# Altium PCB Kasli-DIOT.PCBDOC (part 18 of 23)
Units mm, origin at the board's own origin, x right, y up, seen from the top; angles counter-clockwise.
Board outline 222.9 x 100 mm, 10 copper layers (TopLayer, Layer 2, Layer 3, Layer 4, Layer 5, Layer 6, Layer 7, layer 8, Layer 9, BottomLayer), stack 1.564 mm thick; 977 components, 900 nets, 4676 pads, 2725 vias.
Unrouted connection lines stored in the file: 17.
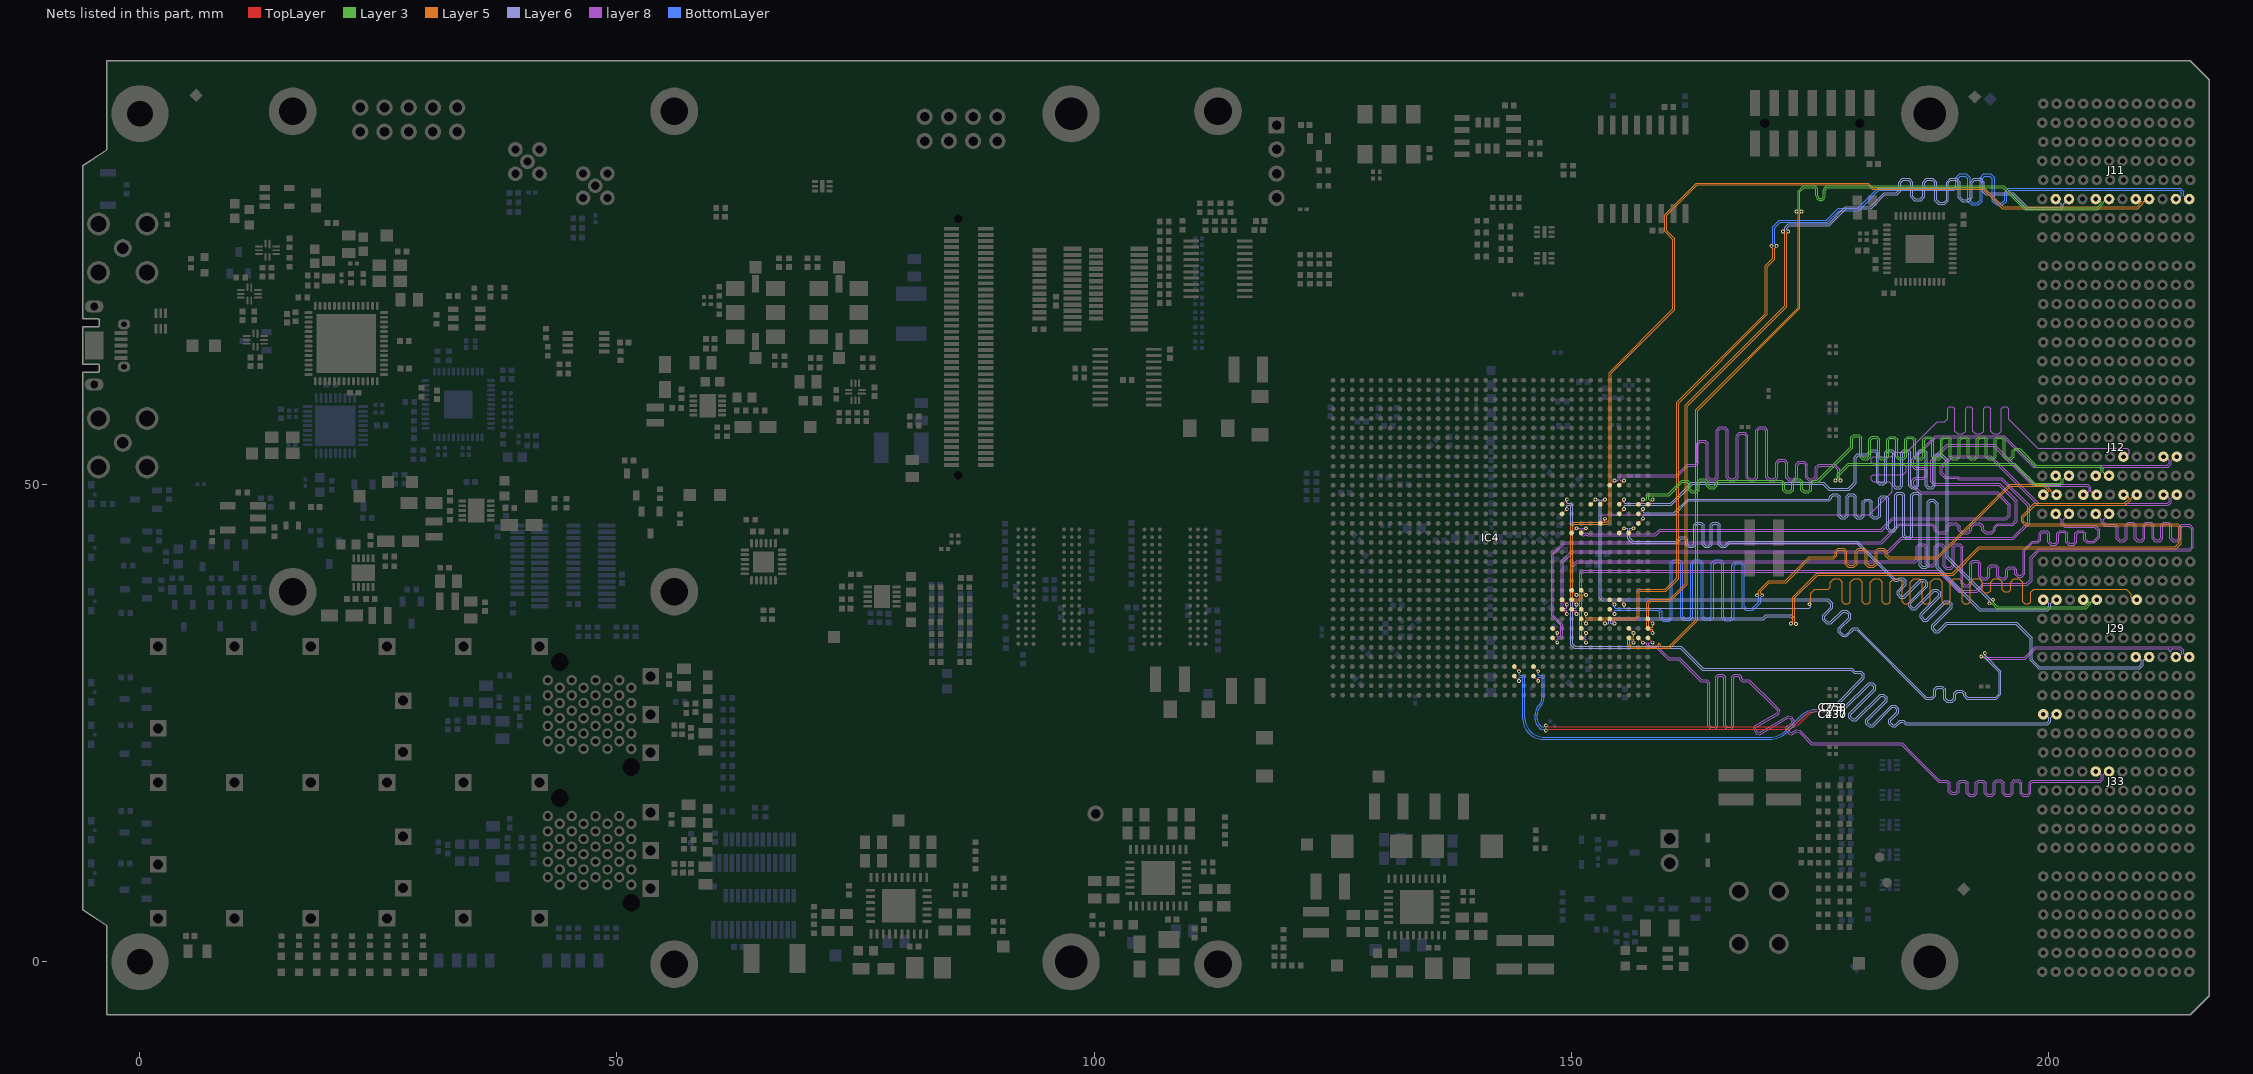
[diagram p24: the nets of this part, all layers, seen from the top]

## Via types
v1: diameter 0.4, hole 0.2, TopLayer to BottomLayer, tented both sides, 1723 vias
v2: diameter 0.5, hole 0.2, TopLayer to BottomLayer, tented both sides, 524 vias
v3: diameter 0.6, hole 0.3, TopLayer to BottomLayer, tented both sides, 172 vias
v4: diameter 0.6, hole 0.3, TopLayer to BottomLayer, 113 vias
v5: diameter 0.5, hole 0.2, TopLayer to BottomLayer, 107 vias
v6: diameter 0.4, hole 0.2, TopLayer to BottomLayer, 67 vias
v7: diameter 0.5, hole 0.25, TopLayer to BottomLayer, tented both sides, 12 vias
v8: diameter 0.8, hole 0.5, TopLayer to BottomLayer, tented both sides, 7 vias

## Nets (pads, with @x,y where several pads share a name; then routed paths per layer and width w, separated by ;. In a path a pad name is that pad's centre, name@x,y a point inside that pad or via, vN(x,y) a via of type N, cw(c..) or ccw(c..) an arc to the next point about the centre after c; other vN are vias at no path point) (continued)
SLOT3.LVDS_4_P: IC4.AD31 J29.E6 | length 97.4
  TopLayer w0.095: IC4.AD31@155.061,37.95 v1(155.561,37.45)
  Layer 5 w0.08: v1(174.994,37.476) 174.994,37.563 175.154,37.723 175.154,38.636 175.573,39.054 176.875,39.054 176.976,39.054 177.186,39.265 177.186,39.796 177.518,40.128 178.111,40.128 178.442,39.796 178.442,37.757 178.653,37.546 179.074,37.546 179.284,37.757 179.284,39.796 179.616,40.128 180.209,40.128 180.54,39.796 180.54,37.757 180.751,37.546 181.172,37.546 181.382,37.757 181.382,39.796 181.714,40.128 182.307,40.128 182.638,39.796 182.638,37.757 182.849,37.546 183.27,37.546 183.48,37.757 183.48,39.796 183.812,40.128 184.405,40.128 184.736,39.796 184.736,37.757 184.947,37.546 185.368,37.546 185.578,37.757 185.578,39.796 185.91,40.128 186.503,40.128 186.834,39.796 186.834,37.757 187.045,37.546 187.466,37.546 187.676,37.757 187.676,39.796 188.008,40.128 188.601,40.128 188.932,39.796 188.932,37.757 189.143,37.546 189.564,37.546 189.774,37.757 189.774,39.796 190.106,40.128 190.699,40.128 191.03,39.796 191.03,37.757 191.241,37.546 191.662,37.546 191.872,37.757 191.872,39.796 192.204,40.128 192.797,40.128 193.128,39.796 193.128,38.91 193.339,38.699 193.76,38.699 193.97,38.91 193.97,39.796 194.302,40.128 194.895,40.128 195.226,39.796 195.226,39.006 195.437,38.796 195.858,38.796 196.068,39.006 196.068,39.796 196.4,40.128 196.993,40.128 197.324,39.796 197.324,37.757 197.535,37.546 197.956,37.546 198.166,37.757 198.166,38.723 198.498,39.054 199.4,39.054 208.175,39.054 208.703,38.527 208.703,38.235 208.75,38.188 208.786,38.188 209.024,37.95 J29.E6@209.3,37.95
  Layer 6 w0.08: v1(155.561,37.45) 155.561,37.1 155.608,37.053 174.957,37.053 175.13,37.226 175.13,37.293 174.994,37.429 v1(174.994,37.476)
SLOT3.LVDS_5_N: IC4.AH27 J12.H1 | length 101.4
  TopLayer w0.095: IC4.AH27@151.061,33.95 v1(151.561,33.45)
  layer 8 w0.075: v1(151.561,33.45) 151.561,33.805 151.517,33.849 151.151,33.849 150.926,34.074 150.926,40.75 151.225,41.05 152.275,41.05 188.628,41.05 189.492,40.185 190.214,39.464 190.723,38.955 192.474,38.955 193.185,39.666 197.738,39.666 198.118,40.045 198.118,42.392 199.009,43.283 214.8,43.283 215.043,43.526 215.043,45.361 214.9,45.504 214.757,45.647 214.201,45.647 214.104,45.647 213.92,45.463 213.92,44.342 213.617,44.039 213.081,44.039 212.779,44.342 212.779,45.676 212.595,45.861 212.226,45.861 212.042,45.676 212.042,44.342 211.739,44.039 211.203,44.039 210.901,44.342 210.901,45.676 210.717,45.861 210.348,45.861 210.164,45.676 210.164,44.342 209.861,44.039 209.325,44.039 209.023,44.342 209.023,45.676 208.839,45.861 208.47,45.861 208.286,45.676 208.286,44.342 207.983,44.039 207.447,44.039 207.145,44.342 207.145,45.463 206.961,45.647 206.761,45.647 206.018,45.647 205.599,46.066 205.599,46.351 J12.H1@205,46.95
SLOT3.LVDS_5_P: IC4.AG27 J12.G1 | length 101.1
  TopLayer w0.095: IC4.AG27@151.061,34.95 v1(151.561,34.45)
  layer 8 w0.075: v1(151.561,34.45) 151.561,34.095 151.517,34.051 151.234,34.051 151.128,34.158 151.128,40.667 151.309,40.848 152.359,40.848 188.544,40.848 189.29,40.102 190,39.392 190.639,38.753 192.558,38.753 193.269,39.464 197.822,39.464 198.32,39.962 198.32,42.309 199.092,43.081 214.883,43.081 215.245,43.442 215.245,45.445 214.841,45.849 214.201,45.849 214.02,45.849 213.718,45.546 213.718,44.425 213.534,44.241 213.165,44.241 212.981,44.425 212.981,45.76 212.678,46.063 212.142,46.063 211.84,45.76 211.84,44.425 211.656,44.241 211.287,44.241 211.103,44.425 211.103,45.76 210.8,46.063 210.264,46.063 209.962,45.76 209.962,44.425 209.778,44.241 209.409,44.241 209.225,44.425 209.225,45.76 208.922,46.063 208.386,46.063 208.084,45.76 208.084,44.425 207.9,44.241 207.531,44.241 207.347,44.425 207.347,45.546 207.044,45.849 206.761,45.849 206.102,45.849 205.801,46.15 205.801,46.351 J12.G1@206.4,46.95
SLOT3.LVDS_6_N: IC4.AE26 J12.K1 | length 97.7
  TopLayer w0.095: IC4.AE26@150.061,36.95 v1(150.561,36.45)
  layer 8 w0.075: v1(150.561,36.45) 150.561,36.805 150.517,36.849 150.157,36.849 149.995,37.011 149.995,41.469 150.575,42.05 185.905,42.05 186.002,42.05 186.186,42.234 186.186,43.495 186.489,43.798 187.024,43.798 187.327,43.495 187.327,41.811 187.511,41.627 187.88,41.627 188.064,41.811 188.064,43.495 188.367,43.798 188.902,43.798 189.205,43.495 189.205,41.532 189.389,41.348 189.758,41.348 189.942,41.532 189.942,43.495 190.245,43.798 190.78,43.798 191.083,43.495 191.083,39.716 191.267,39.532 191.636,39.532 191.82,39.716 191.82,41.796 192.123,42.099 192.659,42.099 192.961,41.796 192.961,40.427 193.145,40.243 193.514,40.243 193.698,40.427 193.698,41.31 194.001,41.612 194.537,41.612 194.839,41.31 194.839,40.427 195.023,40.243 195.392,40.243 195.576,40.427 195.576,41.118 195.879,41.42 196.415,41.42 196.717,41.118 196.717,40.697 196.901,40.513 197.107,40.513 197.143,40.513 197.379,40.748 197.379,43.157 198.331,44.109 198.775,44.109 198.872,44.109 199.056,44.293 199.056,44.9 199.359,45.202 199.895,45.202 200.197,44.9 200.197,44.044 200.381,43.86 200.75,43.86 200.934,44.044 200.934,44.903 201.237,45.205 201.773,45.205 202.075,44.903 202.075,44.044 202.26,43.86 202.628,43.86 202.812,44.044 202.812,44.905 203.115,45.208 203.651,45.208 203.953,44.905 203.953,44.293 204.138,44.109 204.42,44.109 204.759,44.109 205.238,44.588 205.238,45.181 204.862,45.558 201.727,45.558 201.399,45.886 201.399,46.351 J12.K1@200.8,46.95
SLOT3.LVDS_6_P: IC4.AD26 J12.J1 | length 97.4
  TopLayer w0.095: IC4.AD26@150.061,37.95 v1(150.561,37.45)
  layer 8 w0.075: v1(150.561,37.45) 150.561,37.095 150.517,37.051 150.24,37.051 150.197,37.095 150.197,41.386 150.659,41.848 185.905,41.848 186.085,41.848 186.388,42.151 186.388,43.411 186.572,43.596 186.941,43.596 187.125,43.411 187.125,41.728 187.428,41.425 187.963,41.425 188.266,41.728 188.266,43.411 188.45,43.596 188.819,43.596 189.003,43.411 189.003,41.448 189.306,41.146 189.841,41.146 190.144,41.448 190.144,43.411 190.328,43.596 190.697,43.596 190.881,43.411 190.881,39.632 191.184,39.33 191.72,39.33 192.022,39.632 192.022,41.712 192.206,41.897 192.575,41.897 192.759,41.712 192.759,40.343 193.062,40.041 193.598,40.041 193.9,40.343 193.9,41.226 194.084,41.41 194.453,41.41 194.637,41.226 194.637,40.343 194.94,40.041 195.476,40.041 195.778,40.343 195.778,41.034 195.962,41.218 196.331,41.218 196.515,41.034 196.515,40.613 196.818,40.311 197.107,40.311 197.227,40.311 197.581,40.665 197.581,43.073 198.415,43.907 198.775,43.907 198.956,43.907 199.258,44.21 199.258,44.816 199.442,45 199.811,45 199.995,44.816 199.995,43.961 200.298,43.658 200.834,43.658 201.136,43.961 201.136,44.819 201.321,45.003 201.689,45.003 201.873,44.819 201.873,43.961 202.176,43.658 202.712,43.658 203.014,43.961 203.014,44.822 203.199,45.006 203.567,45.006 203.751,44.822 203.751,44.21 204.054,43.907 204.42,43.907 204.843,43.907 205.44,44.505 205.44,45.265 204.945,45.76 201.81,45.76 201.601,45.969 201.601,46.351 J12.J1@202.2,46.95
SLOT3.LVDS_7_N: IC4.AE25 J12.C2 | length 98
  TopLayer w0.095: IC4.AE25@149.061,36.95 v1(149.561,36.45)
  layer 8 w0.075: v1(149.561,36.45) 149.561,36.805 149.517,36.849 149.22,36.849 148.995,37.075 148.995,41.984 150.096,43.085 183.211,43.085 184.603,44.478 196.278,44.478 197.861,46.061 197.861,47.773 195.078,50.556 190.627,50.556 190.516,50.666 189.191,50.666 189.132,50.725 188.686,51.172 188.686,51.871 189.865,53.05 194.018,53.05 196.139,50.929 198.118,48.95 199.018,48.05 212.522,48.05 212.699,48.226 212.699,48.589 212.338,48.95 J12.C2@212.1,48.95
SLOT3.LVDS_7_P: IC4.AD25 J12.B2 | length 97.6
  TopLayer w0.095: IC4.AD25@149.061,37.95 v1(149.561,37.45)
  layer 8 w0.075: v1(149.561,37.45) 149.561,37.095 149.517,37.051 149.304,37.051 149.197,37.158 149.197,41.9 150.18,42.883 183.294,42.883 184.687,44.276 196.362,44.276 198.063,45.977 198.063,47.857 195.162,50.758 190.71,50.758 190.6,50.868 189.275,50.868 188.888,51.255 188.888,51.787 189.948,52.848 193.934,52.848 195.937,50.845 197.904,48.879 198.934,47.848 212.606,47.848 212.901,48.143 212.901,48.589 213.262,48.95 J12.B2@213.5,48.95
SLOT3.LVDS_8_N: IC4.AF30 J12.F2 | length 98.8
  TopLayer w0.095: IC4.AF30@154.061,35.95 v1(154.561,35.45)
  Layer 5 w0.08: v1(173.061,35.45) 173.061,35.479 173.239,35.657 173.239,38.221 175.768,40.75 189.968,40.75 192.722,43.504 213.353,43.504 213.761,43.911 213.761,45.474 213.531,45.704 197.629,45.704 197.221,46.111 197.221,46.711 198.56,48.05 208.014,48.05 208.496,48.533 208.496,48.599 208.145,48.95 J12.F2@207.9,48.95
  Layer 6 w0.08: v1(154.561,35.45) 154.211,35.45 154.165,35.497 154.165,35.688 154.327,35.85 167.622,35.85 167.624,35.851 170.205,35.851 170.517,36.163 173.005,36.163 173.264,35.905 173.264,35.653 v1(173.061,35.45)
SLOT3.LVDS_8_P: IC4.AF29 J12.E2 | length 99.5
  TopLayer w0.095: IC4.AF29@153.061,35.95 v1(153.561,35.45)
  Layer 5 w0.08: v1@173.628,35.438 173.446,35.621 173.446,38.135 175.854,40.543 190.054,40.543 192.808,43.297 213.439,43.297 213.968,43.825 213.968,45.56 213.617,45.911 197.714,45.911 197.428,46.197 197.428,46.625 198.646,47.843 208.099,47.843 208.703,48.447 208.703,48.599 209.054,48.95 J12.E2@209.3,48.95
  Layer 6 w0.08: v1(153.561,35.45) 153.911,35.45 153.958,35.497 153.958,35.774 154.241,36.057 167.536,36.057 167.538,36.058 170.119,36.058 170.431,36.37 173.091,36.37 173.471,35.99 173.471,35.596 173.585,35.482 v1(173.585,35.395)
SLOT3.LVDS_9_N: IC4.AH24 J12.I2 | length 98.2
  TopLayer w0.095: IC4.AH24@148.061,33.95 v1(148.561,33.45)
  layer 8 w0.075: v1(148.561,33.45) 148.561,33.805 148.605,33.849 148.914,33.849 149.147,34.082 149.147,35.348 148.161,36.335 148.161,42.65 149.351,43.84 182.551,43.84 184.451,45.74 186.498,45.74 187.834,45.74 188.093,45.481 188.093,45.23 188.471,44.853 189.157,44.853 189.534,45.23 189.534,45.564 189.793,45.823 190.312,45.823 190.571,45.564 190.571,45.23 190.949,44.853 191.635,44.853 192.012,45.23 192.012,45.564 192.271,45.823 192.79,45.823 193.049,45.564 193.049,45.23 193.427,44.853 194.113,44.853 194.49,45.23 194.49,45.481 194.749,45.74 194.962,45.74 196.337,45.74 196.774,46.177 196.774,48.33 194.923,50.181 188.098,50.181 187.894,50.385 187.894,52.473 189.479,54.057 194.254,54.057 197.504,50.807 198.461,49.85 204.081,49.85 204.299,49.632 204.299,49.311 203.938,48.95 J12.I2@203.7,48.95
SLOT3.LVDS_9_P: IC4.AG24 J12.H2 | length 98.5
  TopLayer w0.095: IC4.AG24@148.061,34.95 v1(148.561,34.45)
  layer 8 w0.075: v1(148.561,34.45) 148.561,34.095 148.605,34.051 148.83,34.051 148.945,34.166 148.945,35.265 147.959,36.251 147.959,42.734 149.267,44.042 182.467,44.042 184.367,45.942 186.498,45.942 187.918,45.942 188.295,45.565 188.295,45.314 188.554,45.055 189.073,45.055 189.332,45.314 189.332,45.648 189.71,46.025 190.396,46.025 190.773,45.648 190.773,45.314 191.032,45.055 191.551,45.055 191.81,45.314 191.81,45.648 192.188,46.025 192.874,46.025 193.251,45.648 193.251,45.314 193.51,45.055 194.029,45.055 194.288,45.314 194.288,45.565 194.666,45.942 194.962,45.942 196.253,45.942 196.572,46.261 196.572,48.246 194.839,49.979 188.014,49.979 187.692,50.301 187.692,52.557 189.395,54.259 194.337,54.259 197.504,51.093 198.545,50.052 204.164,50.052 204.501,49.716 204.501,49.311 204.862,48.95 J12.H2@205.1,48.95
SLOT3.LVDS_10_N: IC4.AE30 J12.L2 | length 106.8
  TopLayer w0.095: IC4.AE30@154.061,36.95 v1(154.561,36.45)
  Layer 5 w0.08: v1(170.035,38.417) 170.035,38.464 169.875,38.624 169.875,38.834 170.792,39.75 172.554,39.75 175.047,42.243 177.361,42.243 177.547,42.243 177.879,42.575 177.879,42.941 178.09,43.151 178.511,43.151 178.721,42.941 178.721,41.667 179.053,41.335 179.645,41.335 179.977,41.667 179.977,42.941 180.188,43.151 180.609,43.151 180.819,42.941 180.819,41.667 181.151,41.335 181.743,41.335 182.075,41.667 182.075,42.941 182.286,43.151 182.707,43.151 182.917,42.941 182.917,42.575 183.249,42.243 183.662,42.243 188.454,42.243 196.061,49.85 199.614,49.85 200.096,49.368 200.096,49.301 199.745,48.95 J12.L2@199.5,48.95
  BottomLayer w0.095: v1(154.561,36.45) 154.561,36.783 154.617,36.839 157.914,36.839 159.105,36.839 159.32,36.625 159.32,36.04 159.664,35.696 160.276,35.696 160.621,36.04 160.621,41.687 160.835,41.901 161.263,41.901 161.478,41.687 161.478,36.13 161.822,35.786 162.434,35.786 162.779,36.13 162.779,41.687 162.993,41.901 163.421,41.901 163.636,41.687 163.636,36.13 163.98,35.786 164.592,35.786 164.937,36.13 164.937,41.687 165.151,41.901 165.579,41.901 165.794,41.687 165.794,36.089 166.138,35.745 166.75,35.745 167.095,36.089 167.095,41.491 167.309,41.706 167.737,41.706 167.952,41.491 167.952,37.183 168.296,36.839 169.064,36.839 169.286,37.061 169.883,37.658 169.883,38.209 170.035,38.361 v1(170.035,38.417)
SLOT3.LVDS_10_P: IC4.AD30 J12.K2 | length 107.2
  TopLayer w0.095: IC4.AD30@154.061,37.95 v1(154.561,37.45)
  Layer 5 w0.08: v1(169.509,38.417) 169.509,38.464 169.668,38.624 169.668,38.92 170.706,39.957 172.468,39.957 174.961,42.45 177.361,42.45 177.462,42.45 177.672,42.66 177.672,43.026 178.004,43.358 178.596,43.358 178.928,43.026 178.928,41.752 179.139,41.542 179.56,41.542 179.77,41.752 179.77,43.026 180.102,43.358 180.694,43.358 181.026,43.026 181.026,41.752 181.237,41.542 181.658,41.542 181.868,41.752 181.868,43.026 182.2,43.358 182.792,43.358 183.124,43.026 183.124,42.66 183.335,42.45 183.662,42.45 188.368,42.45 195.975,50.057 199.7,50.057 200.303,49.453 200.303,49.301 200.654,48.95 J12.K2@200.9,48.95
  BottomLayer w0.095: v1(154.561,37.45) 154.561,37.117 154.617,37.061 157.914,37.061 159.197,37.061 159.542,36.717 159.542,36.132 159.756,35.918 160.184,35.918 160.399,36.132 160.399,41.779 160.743,42.123 161.355,42.123 161.7,41.779 161.7,36.222 161.914,36.008 162.342,36.008 162.557,36.222 162.557,41.779 162.901,42.123 163.513,42.123 163.858,41.779 163.858,36.222 164.072,36.008 164.5,36.008 164.715,36.222 164.715,41.779 165.059,42.123 165.671,42.123 166.016,41.779 166.016,36.181 166.23,35.967 166.658,35.967 166.873,36.181 166.873,41.583 167.217,41.928 167.829,41.928 168.174,41.583 168.174,37.275 168.388,37.061 168.972,37.061 169.286,37.375 169.661,37.75 169.661,38.209 169.509,38.361 v1(169.509,38.417)
SLOT3.LVDS_11_N: IC4.AF27 J11.B3 | length 110.7
  TopLayer w0.095: IC4.AF27@151.061,35.95 v1(151.561,35.45)
  Layer 5 w0.08: v1(151.561,35.45) 151.561,35.8 151.608,35.846 156.769,35.846 157.135,36.212 157.135,38.724 157.261,38.85 159.954,38.85 161.268,40.164 161.268,58.557 170.568,67.857 170.568,72.857 171.368,73.657 171.368,74.803 171.528,74.963 v1(171.528,75.05)
  BottomLayer w0.095: v1(171.528,75.05) 171.528,75.106 171.376,75.258 171.376,76.965 171.911,77.5 176.85,77.5 178.094,78.745 180.144,78.745 182.25,80.85 189.954,80.85 190.159,80.85 190.553,81.244 190.553,82.094 190.817,82.358 191.346,82.358 191.61,82.094 191.61,79.736 192.004,79.342 192.717,79.342 193.111,79.736 193.111,82.094 193.375,82.358 193.904,82.358 194.168,82.094 194.168,79.736 194.562,79.342 195.275,79.342 195.669,79.736 195.669,80.586 195.933,80.85 196.548,80.85 213.789,80.85 213.989,80.65 213.989,80.478 213.989,80.307 213.632,79.95 J11.B3@213.4,79.95
SLOT3.LVDS_11_P: IC4.AE27 J11.A3 | length 111.1
  TopLayer w0.095: IC4.AE27@151.061,36.95 v1(151.561,36.45)
  Layer 5 w0.08: v1(151.561,36.45) 151.561,36.1 151.608,36.053 156.684,36.053 156.928,36.298 156.928,38.81 157.175,39.057 159.868,39.057 161.061,40.25 161.061,58.643 170.361,67.943 170.361,72.943 171.161,73.743 171.161,74.803 171.001,74.963 v1(171.001,75.05)
  BottomLayer w0.095: v1(171.001,75.05) 171.001,75.106 171.154,75.258 171.154,77.056 171.819,77.722 176.758,77.722 178.003,78.967 180.053,78.967 182.158,81.072 189.954,81.072 190.067,81.072 190.331,81.336 190.331,82.186 190.725,82.58 191.438,82.58 191.832,82.186 191.832,79.828 192.096,79.564 192.625,79.564 192.889,79.828 192.889,82.186 193.283,82.58 193.996,82.58 194.39,82.186 194.39,79.828 194.654,79.564 195.183,79.564 195.447,79.828 195.447,80.678 195.841,81.072 196.548,81.072 213.881,81.072 214.211,80.742 214.211,80.386 214.211,80.307 214.568,79.95 J11.A3@214.8,79.95
SLOT3.LVDS_12_N: IC4.AC27 J11.E3 | length 103.2
  TopLayer w0.095: IC4.AC27@151.061,38.95 v1(151.561,38.45)
  Layer 5 w0.08: v1(151.561,38.45) 151.211,38.45 151.165,38.403 151.165,38.124 150.883,37.843 150.174,37.843 149.954,38.063 149.954,45.736 150.275,46.057 153.694,46.057 153.987,46.35 153.987,61.769 160.661,68.443 160.661,75.709 159.814,76.556 159.814,78.322 163.126,81.634 181.182,81.634 181.644,81.171 193.271,81.171 195.295,79.148 209.345,79.148 209.796,79.599 209.796,79.665 209.749,79.712 209.714,79.712 209.476,79.95 J11.E3@209.2,79.95
SLOT3.LVDS_12_P: IC4.AC26 J11.D3 | length 102.5
  TopLayer w0.095: IC4.AC26@150.061,38.95 v1(150.561,38.45)
  Layer 5 w0.08: v1(150.561,38.45) 150.911,38.45 150.958,38.403 150.958,38.21 150.798,38.05 150.26,38.05 150.161,38.149 150.161,45.65 150.361,45.85 153.78,45.85 154.194,46.264 154.194,61.683 160.868,68.357 160.868,75.795 160.021,76.642 160.021,78.236 163.212,81.427 181.096,81.427 181.558,80.964 193.186,80.964 195.209,78.941 209.431,78.941 210.003,79.513 210.003,79.665 210.05,79.712 210.086,79.712 210.324,79.95 J11.D3@210.6,79.95
SLOT3.LVDS_13_N: IC4.AH32 J11.H3 | length 96.1
  TopLayer w0.095: IC4.AH32@156.061,33.95 v1(156.561,33.45)
  Layer 3 w0.075: v1(173.634,78.65) 173.634,78.694 173.797,78.856 173.797,80.796 174.355,81.355 174.626,81.355 175.383,81.355 cw(c175.383,80.862) 175.876,80.862 175.876,80.291 ccw(c176.168,80.291) 176.459,80.291 176.459,80.862 cw(c176.953,80.862) 176.953,81.355 177.091,81.355 195.358,81.355 197.663,79.05 205.11,79.05 205.599,79.539 205.599,79.601 205.249,79.95 J11.H3@205,79.95
  Layer 5 w0.08: v1(156.561,33.45) 156.561,33.8 156.514,33.846 156.256,33.846 156.135,33.725 156.135,33.298 156.383,33.05 158.835,33.05 159.007,33.05 ccw(c159.007,33.165) 159.122,33.165 159.122,33.243 cw(c159.237,33.243) 159.237,33.358 cw(c159.237,33.243) 159.352,33.243 159.352,33.165 ccw(c159.467,33.165) 159.467,33.05 159.737,33.05 160.239,33.05 163.054,35.865 163.054,57.843 173.794,68.583 173.794,78.443 173.634,78.603 v1(173.634,78.65)
SLOT3.LVDS_13_P: IC4.AG32 J11.G3 | length 96.7
  TopLayer w0.095: IC4.AG32@156.061,34.95 v1(156.561,34.45)
  Layer 3 w0.075: v1(174.161,78.65) 174.161,78.694 173.999,78.856 173.999,80.713 174.439,81.153 174.626,81.153 175.383,81.153 cw(c175.383,80.862) 175.674,80.862 175.674,80.291 ccw(c176.168,80.291) 176.661,80.291 176.661,80.862 cw(c176.953,80.862) 176.953,81.153 177.091,81.153 195.274,81.153 197.579,78.848 205.194,78.848 205.801,79.455 205.801,79.601 206.15,79.95 J11.G3@206.4,79.95
  Layer 5 w0.08: v1(156.561,34.45) 156.561,34.1 156.514,34.053 156.171,34.053 155.928,33.811 155.928,33.212 156.297,32.843 160.325,32.843 163.261,35.779 163.261,57.757 174.001,68.497 174.001,78.443 174.161,78.603 v1(174.161,78.65)
SLOT3.LVDS_14_N: IC4.AG34 J11.K3 | length 96.8
  TopLayer w0.095: IC4.AG34@158.061,34.95 v1(158.561,34.45)
  Layer 5 w0.08: v1(158.561,34.45) 158.561,34.8 158.514,34.846 158.175,34.846 157.954,35.068 157.954,36.497 157.954,37.655 158.323,38.024 158.766,38.024 ; v1(172.234,76.55) 172.234,76.503 172.394,76.343 172.394,75.709 172.394,68.768 161.954,58.328 161.954,39.65 160.327,38.023 158.767,38.023 ; 158.766,38.024 158.767,38.023
  Layer 6 w0.08: v1(172.234,76.55) 172.234,76.597 172.394,76.757 172.394,76.986 172.783,77.375 176.993,77.375 178.768,79.15 181.368,79.15 182.821,80.603 184.002,80.603 184.102,80.603 184.363,80.863 184.363,81.729 184.745,82.111 185.437,82.111 185.819,81.729 185.819,80.258 186.079,79.997 186.6,79.997 186.861,80.258 186.861,81.729 187.243,82.111 187.935,82.111 188.317,81.729 188.317,79.885 188.577,79.625 189.098,79.625 189.359,79.885 189.359,81.729 189.741,82.111 190.433,82.111 190.815,81.729 190.815,80.154 191.075,79.894 191.596,79.894 191.857,80.154 191.857,81.729 192.239,82.111 192.931,82.111 193.313,81.729 193.313,80.863 193.573,80.603 194.409,80.603 196.338,80.603 197.862,79.079 201.28,79.079 201.396,79.195 201.396,79.427 200.873,79.95 J11.K3@200.8,79.95
SLOT3.LVDS_14_P: IC4.AF34 J11.J3 | length 96.5
  TopLayer w0.095: IC4.AF34@158.061,35.95 v1(158.561,35.45)
  Layer 5 w0.08: v1(158.561,35.45) 158.561,35.1 158.514,35.053 158.261,35.053 158.161,35.153 158.161,37.569 158.409,37.817 158.663,37.817 158.664,37.816 160.413,37.816 162.161,39.564 162.161,58.243 172.601,68.683 172.601,75.709 172.601,76.343 172.761,76.503 v1(172.761,76.55)
  Layer 6 w0.08: v1(172.761,76.55) 172.761,76.597 172.601,76.757 172.601,76.9 172.869,77.168 177.079,77.168 178.854,78.943 181.454,78.943 182.907,80.396 184.002,80.396 184.188,80.396 184.57,80.777 184.57,81.643 184.83,81.904 185.351,81.904 185.612,81.643 185.612,80.172 185.994,79.79 186.686,79.79 187.068,80.172 187.068,81.643 187.328,81.904 187.849,81.904 188.11,81.643 188.11,79.8 188.492,79.418 189.184,79.418 189.566,79.8 189.566,81.643 189.826,81.904 190.347,81.904 190.608,81.643 190.608,80.069 190.99,79.687 191.682,79.687 192.064,80.069 192.064,81.643 192.324,81.904 192.845,81.904 193.106,81.643 193.106,80.777 193.488,80.396 194.409,80.396 196.252,80.396 197.776,78.872 201.366,78.872 201.603,79.109 201.603,79.427 202.126,79.95 J11.J3@202.2,79.95
SLOT3.LVDS_15_N: IC4.AH34 J33.H5 | length 96.6
  TopLayer w0.095: IC4.AH34@158.061,33.95 v1(158.561,33.45)
  layer 8 w0.075: v1(158.561,33.45) 158.206,33.45 158.162,33.406 158.162,33.196 158.206,33.152 158.98,33.152 159.739,32.393 160.285,31.847 161.396,31.847 163.063,30.18 163.691,29.551 164.264,29.551 164.542,29.274 164.542,24.751 164.701,24.591 165.02,24.591 165.179,24.751 165.179,29.865 165.457,30.142 165.942,30.142 166.22,29.865 166.22,24.751 166.379,24.591 166.698,24.591 166.857,24.751 166.857,29.865 167.135,30.142 167.62,30.142 167.898,29.865 167.898,29.711 168.057,29.551 168.7,29.551 168.702,29.551 171.281,26.972 171.334,26.92 171.558,26.695 171.888,26.366 171.888,26.311 171.797,25.973 171.769,25.945 169.421,24.587 169.363,24.37 169.522,24.094 169.74,24.036 172.747,25.774 172.787,25.774 173.125,25.684 173.153,25.656 173.375,25.272 173.375,25.232 173.284,24.895 173.256,24.866 172.774,24.587 172.715,24.37 172.875,24.094 173.092,24.036 173.623,24.343 173.664,24.343 173.995,24.254 174.016,24.237 174.05,24.204 174.141,24.113 175.29,22.963 184.709,22.963 185.682,21.99 188.622,19.05 189.246,19.05 189.455,19.05 189.758,18.747 189.758,17.932 189.942,17.748 190.311,17.748 190.495,17.932 190.495,18.747 190.797,19.05 191.333,19.05 191.636,18.747 191.636,17.736 191.82,17.552 192.189,17.552 192.373,17.736 192.373,18.747 192.675,19.05 193.211,19.05 193.514,18.747 193.514,17.736 193.698,17.552 194.067,17.552 194.251,17.736 194.251,18.761 194.553,19.064 195.089,19.064 195.392,18.761 195.392,17.736 195.576,17.552 195.945,17.552 196.129,17.736 196.129,18.761 196.431,19.064 196.967,19.064 197.27,18.761 197.27,17.736 197.454,17.552 197.823,17.552 198.007,17.736 198.007,18.747 198.309,19.05 198.49,19.05 205.411,19.05 205.599,19.238 205.599,19.601 205.249,19.95 J33.H5@205,19.95
SLOT3.LVDS_15_P: IC4.AH33 J33.G5 | length 97.2
  TopLayer w0.095: IC4.AH33@157.061,33.95 v1(157.561,33.45)
  layer 8 w0.075: v1(157.561,33.45) 157.916,33.45 157.96,33.406 157.96,33.112 158.122,32.95 158.896,32.95 159.668,32.179 160.202,31.645 161.312,31.645 162.936,30.021 163.607,29.349 164.181,29.349 164.34,29.19 164.34,24.667 164.618,24.389 165.103,24.389 165.381,24.667 165.381,29.781 165.54,29.94 165.859,29.94 166.018,29.781 166.018,24.667 166.296,24.389 166.781,24.389 167.059,24.667 167.059,29.781 167.218,29.94 167.537,29.94 167.696,29.781 167.696,29.627 167.974,29.349 168.618,29.349 168.7,29.268 171.1,26.868 171.191,26.777 171.674,26.294 171.62,26.092 169.272,24.735 169.243,24.706 169.153,24.369 169.153,24.328 169.375,23.945 169.403,23.917 169.741,23.826 169.781,23.826 172.788,25.565 173.006,25.507 173.165,25.231 173.107,25.013 172.625,24.735 172.596,24.706 172.506,24.369 172.506,24.328 172.727,23.945 172.756,23.917 173.093,23.826 173.134,23.826 173.665,24.133 173.896,24.071 173.96,24.008 175.206,22.761 184.625,22.761 185.611,21.776 188.538,18.848 189.246,18.848 189.372,18.848 189.556,18.664 189.556,17.849 189.858,17.546 190.394,17.546 190.697,17.849 190.697,18.664 190.881,18.848 191.25,18.848 191.434,18.664 191.434,17.653 191.736,17.35 192.272,17.35 192.575,17.653 192.575,18.664 192.759,18.848 193.128,18.848 193.312,18.664 193.312,17.653 193.614,17.35 194.15,17.35 194.453,17.653 194.453,18.678 194.637,18.862 195.006,18.862 195.19,18.678 195.19,17.653 195.492,17.35 196.028,17.35 196.331,17.653 196.331,18.678 196.515,18.862 196.884,18.862 197.068,18.678 197.068,17.653 197.37,17.35 197.906,17.35 198.209,17.653 198.209,18.664 198.393,18.848 198.49,18.848 205.495,18.848 205.801,19.154 205.801,19.601 206.15,19.95 J33.G5@206.4,19.95
SLOT3_MGT.MGT_Rx_N: C437.2 IC4.AM20 | length 40.2
  TopLayer w0.095: IC4.AM20@144.061,29.95 v1(144.561,29.45)
  BottomLayer w0.095: v1(144.561,29.45) 144.561,29.783 144.617,29.839 144.859,29.839 144.936,29.763 144.936,25.478 ccw(c147.086,25.478) 144.968,25.107 ccw(c147.086,25.478) 146.715,23.36 ccw(c147.086,25.478) 147.086,23.328 170.771,23.328 ccw(c170.771,26.087) 172.722,24.136 174.069,25.483 cw(c175.865,23.686) 175.865,26.226 176.796,26.226 cw(c176.796,26.089) 176.893,26.186 cw(c176.856,26.149) 176.909,26.149 ccw(c176.961,26.149) 176.924,26.112 177.043,25.993 ccw(c177.086,26.035) C437.2@177.086,25.975
SLOT3_MGT.MGT_Rx_P: C258.2 IC4.AL20 | length 40.2
  TopLayer w0.095: IC4.AL20@144.061,30.95 v1(144.561,30.45)
  BottomLayer w0.095: v1(144.561,30.45) 144.561,30.117 144.617,30.061 144.951,30.061 145.158,29.855 145.158,25.57 ccw(c147.178,25.57) 145.192,25.197 ccw(c147.178,25.57) 146.804,23.585 ccw(c147.178,25.57) 147.178,23.55 170.77,23.55 ccw(c170.77,26.09) 172.566,24.294 173.912,25.64 cw(c175.863,23.689) 175.863,26.448 176.796,26.448 ccw(c176.796,26.586) 176.893,26.489 ccw(c176.856,26.526) 176.909,26.526 cw(c176.961,26.526) 176.924,26.563 177.043,26.682 cw(c177.086,26.64) C258.2@177.086,26.7
SLOT3_MGT.MGT_Tx_N: C230.1 IC4.AM22 | length 38.3
  TopLayer w0.095: IC4.AM22@146.061,29.95 v1(146.561,29.45) ; v6(147.361,24.261) 147.43,24.261 147.569,24.4 147.736,24.4 172.269,24.4 ccw(c172.269,27.16) 174.22,25.209 174.661,25.65 cw(c176.053,24.258) 176.053,26.226 176.796,26.226 cw(c176.796,26.089) 176.893,26.186 cw(c176.856,26.149) 176.909,26.149 ccw(c176.961,26.149) 176.924,26.112 177.043,25.993 ccw(c177.086,26.035) C230.1@177.086,25.975
  BottomLayer w0.095: v1(146.561,29.45) 146.561,29.783 146.617,29.839 146.841,29.839 146.961,29.719 146.961,27.669 cw(c145.95,27.669) 146.666,26.955 146.664,26.953 ccw(c147.689,25.927) 146.239,25.927 146.239,25.354 ccw(c147.063,25.354) 146.48,24.772 146.852,24.4 147.153,24.4 147.292,24.261 v6(147.361,24.261)
SLOT3_MGT.MGT_Tx_P: C73.1 IC4.AL22 | length 38.3
  TopLayer w0.095: IC4.AL22@146.061,30.95 v1(146.561,30.45) ; v6(147.361,24.761) 147.43,24.761 147.569,24.622 147.736,24.622 172.267,24.623 ccw(c172.267,27.163) 174.063,25.366 174.506,25.809 cw(c176.05,24.265) 176.05,26.448 176.796,26.448 ccw(c176.796,26.586) 176.893,26.489 ccw(c176.856,26.526) 176.909,26.526 cw(c176.961,26.526) 176.924,26.563 177.043,26.682 cw(c177.086,26.64) C73.1@177.086,26.7
  BottomLayer w0.095: v1(146.561,30.45) 146.561,30.117 146.617,30.061 146.933,30.061 147.183,29.811 147.183,27.668 cw(c145.952,27.668) 146.824,26.799 cw(c145.952,27.668) 146.822,26.797 ; 146.822,26.797 ccw(c147.695,25.925) 146.461,25.925 146.461,25.446 ccw(c147.285,25.446) 146.702,24.864 146.943,24.622 147.153,24.622 147.292,24.761 v6(147.361,24.761)
SLOT4.LVDS_0_N: IC4.P29 J29.B3 | length 94.9
  TopLayer w0.095: IC4.P29@153.061,47.95 v1(153.561,48.45)
  Layer 6 w0.08: v1(153.561,48.45) 153.211,48.45 153.165,48.403 153.165,38.246 153.361,38.05 176.961,38.05 177.289,37.722 177.36,37.651 177.454,37.557 177.454,37.088 176.59,36.225 176.59,35.927 176.888,35.629 177.186,35.629 178.429,36.873 178.899,36.873 179.318,36.454 179.318,35.985 178.236,34.903 178.236,34.605 178.533,34.308 178.831,34.308 179.533,35.009 180.002,35.009 180.062,34.949 180.134,34.877 187.261,27.75 187.698,27.75 187.799,27.75 188.009,27.96 188.009,28.557 188.341,28.889 188.933,28.889 189.265,28.557 189.265,27.629 189.476,27.419 189.897,27.419 190.107,27.629 190.107,28.131 190.439,28.463 191.031,28.463 191.363,28.131 191.363,27.96 191.574,27.75 192.307,27.75 194.496,27.75 194.861,28.115 194.861,30.361 193.37,31.852 193.263,31.959 193.036,31.959 v1(193.003,31.992)
  layer 8 w0.075: v1(193.003,31.992) 193.065,31.93 193.295,31.93 193.516,31.71 197.621,31.71 198.735,32.824 212.338,32.824 212.601,32.824 cw(c212.601,32.712) 212.713,32.712 212.713,32.629 ccw(c212.826,32.629) 212.826,32.516 ccw(c212.826,32.629) 212.938,32.629 212.938,32.712 cw(c213.051,32.712) 213.051,32.824 213.209,32.824 213.753,32.824 213.999,32.578 213.999,32.299 213.649,31.95 J29.B3@213.4,31.95
SLOT4.LVDS_0_P: IC4.P28 J29.A3 | length 95.5
  TopLayer w0.095: IC4.P28@152.061,47.95 v1(152.561,48.45)
  Layer 6 w0.08: v1(152.561,48.45) 152.911,48.45 152.958,48.403 152.958,38.161 153.275,37.843 176.875,37.843 177.143,37.576 177.214,37.504 177.247,37.472 177.247,37.174 176.383,36.311 176.383,35.841 176.802,35.422 177.271,35.422 178.515,36.666 178.813,36.666 179.111,36.368 179.111,36.071 178.029,34.989 178.029,34.52 178.448,34.101 178.917,34.101 179.618,34.802 179.916,34.802 179.987,34.731 187.175,27.543 187.698,27.543 187.884,27.543 188.216,27.875 188.216,28.471 188.427,28.682 188.848,28.682 189.058,28.471 189.058,27.543 189.39,27.212 189.982,27.212 190.314,27.543 190.314,28.046 190.525,28.256 190.946,28.256 191.156,28.046 191.156,27.875 191.488,27.543 192.307,27.543 194.581,27.543 195.068,28.03 195.068,30.447 193.456,32.059 193.409,32.105 193.409,32.332 v1(193.376,32.365)
  layer 8 w0.075: v1(193.376,32.365) 193.438,32.303 193.438,32.073 193.599,31.912 197.537,31.912 198.652,33.026 213.836,33.026 214.201,32.662 214.201,32.299 214.55,31.95 J29.A3@214.8,31.95
SLOT4.LVDS_1_N: IC4.U32 J29.E3 | length 93.5
  TopLayer w0.095: IC4.U32@156.061,44.95 v1(156.561,45.45)
  Layer 6 w0.08: v1(156.561,45.45) 156.211,45.45 156.165,45.403 156.165,44.447 156.511,44.1 160.925,44.1 161.025,44.1 161.186,44.26 161.186,44.265 161.467,44.547 161.96,44.547 162.242,44.265 162.242,43.797 162.402,43.637 162.723,43.637 162.884,43.797 162.884,45.788 163.165,46.07 163.658,46.07 163.94,45.788 163.94,43.797 164.1,43.637 164.421,43.637 164.582,43.797 164.582,45.788 164.863,46.07 165.356,46.07 165.638,45.788 165.638,43.797 165.798,43.637 166.119,43.637 166.28,43.797 166.28,43.818 166.561,44.1 168.31,44.1 180.011,44.1 183.935,40.176 184.006,40.105 184.233,40.105 184.405,40.277 184.803,40.277 185.152,39.929 185.152,39.531 184.395,38.774 184.395,38.547 184.621,38.32 184.848,38.32 186.631,40.102 187.03,40.102 187.378,39.754 187.378,39.356 185.595,37.573 185.595,37.346 185.822,37.119 186.049,37.119 187.992,39.062 188.391,39.062 188.739,38.714 188.739,38.316 186.796,36.372 186.796,36.145 187.023,35.918 187.25,35.918 189.193,37.862 189.592,37.862 189.94,37.513 189.94,37.115 187.997,35.172 187.997,34.945 188.223,34.718 188.45,34.718 189.335,35.602 190.453,35.602 196.717,35.602 198.368,33.951 198.368,31.687 199.105,30.95 209.553,30.95 209.796,31.193 209.796,31.599 209.445,31.95 J29.E3@209.2,31.95
SLOT4.LVDS_1_P: IC4.U31 J29.D3 | length 94.2
  TopLayer w0.095: IC4.U31@155.061,44.95 v1(155.561,45.45)
  Layer 6 w0.08: v1(155.561,45.45) 155.911,45.45 155.958,45.403 155.958,44.361 156.425,43.893 160.925,43.893 161.111,43.893 161.393,44.175 161.393,44.179 161.553,44.34 161.874,44.34 162.035,44.179 162.035,43.712 162.316,43.43 162.809,43.43 163.091,43.712 163.091,45.703 163.251,45.863 163.572,45.863 163.733,45.703 163.733,43.712 164.014,43.43 164.507,43.43 164.789,43.712 164.789,45.703 164.949,45.863 165.27,45.863 165.431,45.703 165.431,43.712 165.712,43.43 166.205,43.43 166.487,43.712 166.487,43.733 166.647,43.893 168.31,43.893 179.925,43.893 183.788,40.03 183.859,39.959 183.92,39.898 184.318,39.898 184.491,40.07 184.718,40.07 184.945,39.843 184.945,39.616 184.188,38.859 184.188,38.461 184.536,38.113 184.934,38.113 186.717,39.895 186.944,39.895 187.171,39.668 187.171,39.441 185.388,37.659 185.388,37.26 185.736,36.912 186.135,36.912 188.078,38.855 188.305,38.855 188.532,38.628 188.532,38.401 186.589,36.458 186.589,36.06 186.937,35.711 187.336,35.711 189.279,37.655 189.506,37.655 189.733,37.428 189.733,37.201 187.79,35.257 187.79,34.859 188.138,34.511 188.536,34.511 189.421,35.395 190.246,35.395 196.632,35.395 198.161,33.866 198.161,31.602 199.02,30.743 209.639,30.743 210.003,31.107 210.003,31.599 210.354,31.95 J29.D3@210.6,31.95
SLOT4.LVDS_2_N: IC4.P25 J33.L8 | length 94.9
  TopLayer w0.095: IC4.P25@149.061,47.95 v1(149.561,48.45)
  Layer 6 w0.08: v1(149.561,48.45) 149.561,48.1 149.608,48.054 149.95,48.054 150.168,47.836 150.168,33.324 150.418,33.074 161.537,33.074 163.854,30.757 178.603,30.757 179.454,30.757 179.599,30.612 179.76,30.451 179.987,30.451 180.006,30.469 180.404,30.469 180.752,30.121 180.752,29.723 178.144,27.114 178.144,26.887 178.371,26.66 178.598,26.66 181.206,29.269 181.605,29.269 181.953,28.92 181.953,28.522 179.345,25.914 179.345,25.687 179.572,25.46 179.799,25.46 182.407,28.068 182.806,28.068 183.154,27.72 183.154,27.321 181.12,25.287 181.12,25.06 181.347,24.833 181.574,24.833 183.608,26.867 184.006,26.867 184.354,26.519 184.354,26.121 183.521,25.287 183.521,25.06 183.748,24.833 183.975,24.833 184.477,25.335 184.876,25.335 184.936,25.275 185.007,25.204 185.161,25.05 199.903,25.05 200.096,25.243 200.096,25.599 199.745,25.95 J33.L8@199.5,25.95
SLOT4.LVDS_2_P: IC4.R25 J33.K8 | length 95.2
  TopLayer w0.095: IC4.R25@149.061,46.95 v1(149.561,47.45)
  Layer 6 w0.08: v1(149.561,47.45) 149.561,47.8 149.608,47.847 149.865,47.847 149.961,47.75 149.961,33.238 150.332,32.867 161.451,32.867 163.768,30.55 178.396,30.55 179.368,30.55 179.53,30.389 179.674,30.244 180.073,30.244 180.091,30.262 180.318,30.262 180.545,30.035 180.545,29.808 177.937,27.2 177.937,26.802 178.285,26.453 178.684,26.453 181.292,29.062 181.519,29.062 181.746,28.835 181.746,28.608 179.138,25.999 179.138,25.601 179.486,25.253 179.884,25.253 182.493,27.861 182.72,27.861 182.947,27.634 182.947,27.407 180.913,25.373 180.913,24.975 181.261,24.626 181.659,24.626 183.693,26.66 183.92,26.66 184.147,26.433 184.147,26.206 183.314,25.373 183.314,24.975 183.662,24.626 184.061,24.626 184.563,25.128 184.79,25.128 184.861,25.057 185.075,24.843 199.989,24.843 200.303,25.157 200.303,25.599 200.655,25.95 J33.K8@200.9,25.95
SLOT4.LVDS_3_N: IC4.P31 J29.I6 | length 95.5
  TopLayer w0.095: IC4.P31@155.061,47.95 v1(155.561,48.45)
  Layer 3 w0.075: v1(194.245,37.952) 194.276,37.921 194.276,37.691 194.731,37.236 203.922,37.236 204.299,37.612 204.299,37.674 204.255,37.718 204.209,37.718 203.977,37.95 J29.I6@203.7,37.95
  Layer 6 w0.08: v1(155.561,48.45) 155.561,48.1 155.608,48.054 160.446,48.054 162.653,50.261 176.486,50.261 177.103,49.643 179.061,49.643 179.686,50.268 179.686,52.891 180.024,53.229 180.668,53.229 181.013,53.229 181.174,53.39 181.174,53.395 181.455,53.677 181.948,53.677 182.23,53.395 182.23,50.357 182.39,50.197 182.711,50.197 182.872,50.357 182.872,53.395 183.153,53.677 183.646,53.677 183.928,53.395 183.928,49.964 184.088,49.804 184.409,49.804 184.57,49.964 184.57,53.395 184.851,53.677 185.344,53.677 185.626,53.395 185.626,49.964 185.786,49.804 186.107,49.804 186.268,49.964 186.268,53.395 186.549,53.677 187.042,53.677 187.324,53.395 187.324,49.964 187.484,49.804 187.805,49.804 187.966,49.964 187.966,52.947 188.247,53.229 188.434,53.229 188.849,53.229 189.519,52.559 189.519,42.451 193.985,37.985 194.211,37.985 v1(194.245,37.952)
SLOT4.LVDS_3_P: IC4.R31 J29.H6 | length 95.8
  TopLayer w0.095: IC4.R31@155.061,46.95 v1(155.561,47.45)
  Layer 3 w0.075: v1(193.872,37.579) 193.903,37.548 194.133,37.548 194.648,37.034 204.006,37.034 204.501,37.528 204.501,37.674 204.545,37.718 204.591,37.718 204.822,37.95 J29.H6@205.1,37.95
  Layer 6 w0.08: v1(155.561,47.45) 155.561,47.8 155.608,47.847 160.532,47.847 162.738,50.054 176.4,50.054 177.017,49.436 179.147,49.436 179.893,50.182 179.893,52.805 180.11,53.022 180.668,53.022 181.099,53.022 181.381,53.304 181.381,53.31 181.541,53.47 181.862,53.47 182.023,53.31 182.023,50.272 182.304,49.99 182.797,49.99 183.079,50.272 183.079,53.31 183.239,53.47 183.56,53.47 183.721,53.31 183.721,49.878 184.002,49.597 184.495,49.597 184.777,49.878 184.777,53.31 184.937,53.47 185.258,53.47 185.419,53.31 185.419,49.878 185.7,49.597 186.193,49.597 186.475,49.878 186.475,53.31 186.635,53.47 186.956,53.47 187.117,53.31 187.117,49.878 187.398,49.597 187.891,49.597 188.173,49.878 188.173,52.862 188.333,53.022 188.434,53.022 188.763,53.022 189.312,52.473 189.312,42.366 191.287,40.391 193.839,37.839 193.839,37.613 v1(193.872,37.579)
SLOT4.LVDS_4_N: IC4.R33 J29.L6 | length 96.1
  TopLayer w0.095: IC4.R33@157.061,46.95 v1(157.561,47.45)
  Layer 6 w0.08: v1(157.561,47.45) 157.561,47.107 157.608,47.06 160.775,47.06 162.224,48.51 176.845,48.51 176.982,48.51 177.143,48.67 177.143,48.774 177.424,49.056 177.917,49.056 178.199,48.774 178.199,46.804 178.359,46.644 178.68,46.644 178.841,46.804 178.841,48.774 179.122,49.056 179.615,49.056 179.897,48.774 179.897,46.804 180.057,46.644 180.378,46.644 180.539,46.804 180.539,48.228 180.82,48.51 181.313,48.51 181.595,48.228 181.595,46.804 181.755,46.644 182.076,46.644 182.237,46.804 182.237,48.588 182.518,48.87 183.011,48.87 183.293,48.588 183.293,45.455 183.453,45.295 183.774,45.295 183.935,45.455 183.935,48.935 184.216,49.217 184.709,49.217 184.991,48.935 184.991,44.708 185.151,44.547 185.472,44.547 185.633,44.708 185.633,48.935 185.914,49.217 186.407,49.217 186.689,48.935 186.689,41.608 186.849,41.447 187.17,41.447 187.331,41.608 187.331,48.213 187.612,48.495 188.011,48.495 188.111,48.394 188.51,47.996 188.51,41.401 192.901,37.01 199.882,37.01 200.096,37.224 200.096,37.599 199.745,37.95 J29.L6@199.5,37.95
SLOT4.LVDS_4_P: IC4.T33 J29.K6 | length 96.4
  TopLayer w0.095: IC4.T33@157.061,45.95 v1(157.561,46.45)
  Layer 6 w0.08: v1(157.561,46.45) 157.561,46.806 157.608,46.853 160.86,46.853 162.31,48.303 176.845,48.303 177.068,48.303 177.35,48.585 177.35,48.689 177.51,48.849 177.831,48.849 177.992,48.689 177.992,46.719 178.273,46.437 178.766,46.437 179.048,46.719 179.048,48.689 179.208,48.849 179.529,48.849 179.69,48.689 179.69,46.719 179.971,46.437 180.464,46.437 180.746,46.719 180.746,48.143 180.906,48.303 181.227,48.303 181.388,48.143 181.388,46.719 181.669,46.437 182.162,46.437 182.444,46.719 182.444,48.503 182.604,48.663 182.925,48.663 183.086,48.503 183.086,45.369 183.367,45.088 183.86,45.088 184.142,45.369 184.142,48.849 184.302,49.01 184.623,49.01 184.784,48.849 184.784,44.622 185.065,44.34 185.558,44.34 185.84,44.622 185.84,48.849 186,49.01 186.321,49.01 186.482,48.849 186.482,41.522 186.763,41.24 187.256,41.24 187.538,41.522 187.538,48.127 187.698,48.288 187.925,48.288 188.111,48.102 188.303,47.91 188.303,41.315 192.815,36.803 199.968,36.803 200.303,37.138 200.303,37.599 200.655,37.95 J29.K6@200.9,37.95
SLOT4.LVDS_5_N: IC4.P34 J12.H3 | length 94.3
  TopLayer w0.095: IC4.P34@158.061,47.95 v1(158.561,48.45)
  Layer 3 w0.075: v1(158.561,48.45) 158.206,48.45 158.162,48.494 158.162,48.83 158.206,48.874 160.285,48.874 161.684,50.273 161.945,50.273 162.131,50.273 162.315,50.089 162.315,49.454 162.618,49.151 163.154,49.151 163.456,49.454 163.456,50.24 163.641,50.424 164.009,50.424 164.193,50.24 164.193,49.902 164.496,49.599 165.032,49.599 165.334,49.902 165.334,50.089 165.519,50.273 165.615,50.273 171.014,50.273 172.027,50.273 172.211,50.089 172.211,49.454 172.514,49.151 173.05,49.151 173.352,49.454 173.352,50.24 173.537,50.424 173.905,50.424 174.089,50.24 174.089,49.454 174.392,49.151 174.928,49.151 175.23,49.454 175.23,50.089 175.415,50.273 175.511,50.273 175.916,50.273 179.235,53.592 179.544,53.901 179.544,54.875 179.728,55.06 180.097,55.06 180.281,54.875 180.281,52.932 180.584,52.629 181.12,52.629 181.422,52.932 181.422,54.677 181.606,54.861 181.975,54.861 182.159,54.677 182.159,52.932 182.462,52.629 182.998,52.629 183.3,52.932 183.3,54.674 183.484,54.858 183.853,54.858 184.037,54.674 184.037,52.932 184.34,52.629 184.876,52.629 185.178,52.932 185.178,54.674 185.362,54.858 185.731,54.858 185.915,54.674 185.915,52.932 186.218,52.629 186.754,52.629 187.056,52.932 187.056,54.674 187.24,54.858 187.609,54.858 187.793,54.674 187.793,52.932 188.096,52.629 188.632,52.629 188.934,52.932 188.934,54.674 189.118,54.858 189.487,54.858 189.671,54.674 189.671,52.932 189.974,52.629 190.51,52.629 190.812,52.932 190.812,54.674 190.996,54.858 191.365,54.858 191.549,54.674 191.549,52.932 191.852,52.629 192.388,52.629 192.69,52.932 192.69,54.674 192.874,54.858 193.243,54.858 193.427,54.674 193.427,52.932 193.73,52.629 194.266,52.629 194.568,52.932 194.568,54.674 194.752,54.858 195.121,54.858 195.305,54.674 195.305,52.932 195.608,52.629 196.144,52.629 196.446,52.932 196.446,53.468 196.63,53.652 196.891,53.652 197.071,53.471 198.693,51.85 205.361,51.85 205.599,51.613 205.599,51.311 205.238,50.95 J12.H3@205,50.95
SLOT4.LVDS_5_P: IC4.P33 J12.G3 | length 95
  TopLayer w0.095: IC4.P33@157.061,47.95 v1(157.561,48.45)
  Layer 3 w0.075: v1(157.561,48.45) 157.916,48.45 157.96,48.494 157.96,48.913 158.122,49.076 160.201,49.076 161.6,50.475 161.945,50.475 162.215,50.475 162.517,50.172 162.517,49.537 162.702,49.353 163.07,49.353 163.254,49.537 163.254,50.323 163.557,50.626 164.093,50.626 164.395,50.323 164.395,49.986 164.58,49.801 164.948,49.801 165.132,49.986 165.132,50.172 165.435,50.475 165.615,50.475 171.014,50.475 172.111,50.475 172.413,50.172 172.413,49.537 172.598,49.353 172.966,49.353 173.15,49.537 173.15,50.323 173.453,50.626 173.989,50.626 174.291,50.323 174.291,49.537 174.476,49.353 174.844,49.353 175.028,49.537 175.028,50.172 175.331,50.475 175.511,50.475 175.832,50.475 179.235,53.878 179.342,53.985 179.342,54.959 179.645,55.262 180.181,55.262 180.483,54.959 180.483,53.015 180.667,52.831 181.036,52.831 181.22,53.015 181.22,54.761 181.523,55.063 182.059,55.063 182.361,54.761 182.361,53.015 182.545,52.831 182.914,52.831 183.098,53.015 183.098,54.758 183.401,55.06 183.937,55.06 184.239,54.758 184.239,53.015 184.423,52.831 184.792,52.831 184.976,53.015 184.976,54.758 185.279,55.06 185.815,55.06 186.117,54.758 186.117,53.015 186.301,52.831 186.67,52.831 186.854,53.015 186.854,54.758 187.157,55.06 187.693,55.06 187.995,54.758 187.995,53.015 188.179,52.831 188.548,52.831 188.732,53.015 188.732,54.758 189.035,55.06 189.571,55.06 189.873,54.758 189.873,53.015 190.057,52.831 190.426,52.831 190.61,53.015 190.61,54.758 190.913,55.06 191.449,55.06 191.751,54.758 191.751,53.015 191.935,52.831 192.304,52.831 192.488,53.015 192.488,54.758 192.791,55.06 193.327,55.06 193.629,54.758 193.629,53.015 193.813,52.831 194.182,52.831 194.366,53.015 194.366,54.758 194.669,55.06 195.205,55.06 195.507,54.758 195.507,53.015 195.691,52.831 196.06,52.831 196.244,53.015 196.244,53.551 196.547,53.854 196.975,53.854 197.071,53.757 198.777,52.052 205.445,52.052 205.801,51.696 205.801,51.311 206.162,50.95 J12.G3@206.4,50.95
SLOT4.LVDS_6_N: IC4.M31 J12.K3 | length 96
  TopLayer w0.095: IC4.M31@155.061,49.95 v1(155.561,50.45)
  Layer 3 w0.075: v1(177.734,50.45) 177.734,50.494 177.896,50.656 177.896,51.084 179.066,52.254 196.525,52.254 197.577,51.203 197.955,50.825 198.19,50.589 198.629,50.15 201.259,50.15 201.399,50.29 201.399,50.589 201.038,50.95 J12.K3@200.8,50.95
  layer 8 w0.075: v1(155.561,50.45) 155.206,50.45 155.162,50.494 155.162,50.782 155.23,50.85 161.147,50.85 162.247,51.95 162.847,51.95 163.028,51.95 163.355,52.278 163.355,54.255 163.565,54.464 163.983,54.464 164.192,54.255 164.192,50.748 164.52,50.42 165.106,50.42 165.433,50.748 165.433,55.657 165.643,55.867 166.061,55.867 166.27,55.657 166.27,50.748 166.598,50.42 167.184,50.42 167.511,50.748 167.511,55.076 167.721,55.286 168.139,55.286 168.348,55.076 168.348,50.748 168.676,50.42 169.262,50.42 169.589,50.748 169.589,55.657 169.799,55.867 170.217,55.867 170.426,55.657 170.426,50.748 170.754,50.42 171.34,50.42 171.667,50.748 171.667,52.253 171.877,52.462 172.295,52.462 172.504,52.253 172.504,50.748 172.832,50.42 173.418,50.42 173.745,50.748 173.745,52.062 173.955,52.271 174.373,52.271 174.582,52.062 174.582,50.748 174.91,50.42 175.496,50.42 175.823,50.748 175.823,51.741 176.033,51.95 177.421,51.95 177.575,51.95 177.953,51.573 177.953,50.669 v1(177.734,50.45)
SLOT4.LVDS_6_P: IC4.M30 J12.J3 | length 96.6
  TopLayer w0.095: IC4.M30@154.061,49.95 v1(154.561,50.45)
  Layer 3 w0.075: v1(178.261,50.45) 178.261,50.494 178.099,50.656 178.099,51.001 179.15,52.052 196.442,52.052 197.493,51.001 197.753,50.741 197.976,50.518 198.546,49.948 201.343,49.948 201.601,50.206 201.601,50.589 201.962,50.95 J12.J3@202.2,50.95
  layer 8 w0.075: v1(154.561,50.45) 154.916,50.45 154.96,50.494 154.96,50.866 155.146,51.052 161.063,51.052 162.163,52.152 162.847,52.152 162.944,52.152 163.153,52.361 163.153,54.339 163.481,54.666 164.067,54.666 164.394,54.339 164.394,50.832 164.604,50.622 165.022,50.622 165.231,50.832 165.231,55.741 165.559,56.069 166.145,56.069 166.472,55.741 166.472,50.832 166.682,50.622 167.1,50.622 167.309,50.832 167.309,55.16 167.637,55.488 168.223,55.488 168.55,55.16 168.55,50.832 168.76,50.622 169.178,50.622 169.387,50.832 169.387,55.741 169.715,56.069 170.301,56.069 170.628,55.741 170.628,50.832 170.838,50.622 171.256,50.622 171.465,50.832 171.465,52.336 171.793,52.664 172.379,52.664 172.706,52.336 172.706,50.832 172.916,50.622 173.334,50.622 173.543,50.832 173.543,52.145 173.871,52.473 174.457,52.473 174.784,52.145 174.784,50.832 174.994,50.622 175.412,50.622 175.621,50.832 175.621,51.824 175.949,52.152 177.421,52.152 177.659,52.152 178.155,51.656 178.155,50.644 178.261,50.538 v1(178.261,50.45)
SLOT4.LVDS_7_N: IC4.U27 J12.C4 | length 94.6
  TopLayer w0.095: IC4.U27@151.061,44.95 v1(151.561,45.45)
  layer 8 w0.075: v1(151.561,45.45) 151.206,45.45 151.162,45.406 151.162,44.95 151.232,44.88 151.295,44.88 151.453,44.912 cw(c151.561,44.383) 151.832,44.85 158.775,44.85 159.275,45.35 182.475,45.35 183.655,46.529 195.54,46.529 195.845,46.834 195.845,47.847 194.644,49.048 186.568,49.048 186.043,49.573 185.703,49.913 185.703,50.254 185.703,50.479 186.031,50.807 186.906,50.807 187.115,51.016 187.115,51.435 186.906,51.644 186.031,51.644 185.703,51.972 185.703,52.152 185.703,52.685 188.17,55.152 195.427,55.152 197.248,53.33 198.034,52.544 198.529,52.05 212.506,52.05 212.699,52.242 212.699,52.589 212.338,52.95 J12.C4@212.1,52.95
SLOT4.LVDS_7_P: IC4.U26 J12.B4 | length 95.3
  TopLayer w0.095: IC4.U26@150.061,44.95 v1(150.561,45.45)
  layer 8 w0.075: v1(150.561,45.45) 150.916,45.45 150.96,45.406 150.96,44.866 151.161,44.665 151.375,44.665 cw(c151.561,44.383) 151.77,44.648 158.859,44.648 159.359,45.148 182.559,45.148 183.738,46.327 195.624,46.327 196.047,46.75 196.047,47.931 194.728,49.25 186.652,49.25 186.329,49.573 185.905,49.997 185.905,50.254 185.905,50.396 186.114,50.605 186.989,50.605 187.317,50.933 187.317,51.518 186.989,51.846 186.114,51.846 185.905,52.055 185.905,52.152 185.905,52.602 188.253,54.95 195.343,54.95 197.046,53.247 197.82,52.473 198.445,51.848 212.59,51.848 212.901,52.159 212.901,52.589 213.262,52.95 J12.B4@213.5,52.95
SLOT4.LVDS_8_N: IC4.T29 J12.F4 | length 95.1
  TopLayer w0.095: IC4.T29@153.061,45.95 v1(153.561,46.45)
  layer 8 w0.075: v1(153.561,46.45) 153.561,46.095 153.517,46.051 153.207,46.051 153.163,46.095 153.163,46.724 153.31,46.871 181.282,46.871 183.679,49.268 183.679,49.843 183.679,50.024 183.376,50.326 181.655,50.326 181.471,50.511 181.471,50.879 181.655,51.063 184.842,51.063 185.145,51.366 185.145,51.902 184.842,52.204 181.655,52.204 181.471,52.389 181.471,52.757 181.655,52.941 183.556,52.941 184.005,53.39 185.15,53.39 185.182,53.422 188.379,56.62 189.003,56.62 189.183,56.62 189.486,56.922 189.486,57.987 189.67,58.171 190.039,58.171 190.223,57.987 190.223,55.63 190.526,55.327 191.061,55.327 191.364,55.63 191.364,57.987 191.548,58.171 191.917,58.171 192.101,57.987 192.101,55.63 192.404,55.327 192.939,55.327 193.242,55.63 193.242,57.987 193.426,58.171 193.795,58.171 193.979,57.987 193.979,55.63 194.282,55.327 194.817,55.327 195.12,55.63 195.12,57.987 195.304,58.171 195.673,58.171 195.857,57.987 195.857,56.896 197.511,55.242 198.898,53.855 206.761,53.855 207.024,53.855 cw(c207.024,53.743) 207.136,53.743 207.136,53.66 ccw(c207.249,53.66) 207.249,53.547 ccw(c207.249,53.66) 207.361,53.66 207.361,53.743 cw(c207.474,53.743) 207.474,53.855 207.8,53.855 208.281,53.855 208.499,53.638 208.499,53.311 208.138,52.95 J12.F4@207.9,52.95